# Altium PCB adl5960-devboard.PcbDoc (part 2 of 2)
Units mm, origin at the board's own origin, x right, y up, seen from the top; angles counter-clockwise.
Board outline 70 x 110 mm, 4 copper layers (Top Layer, Inner 1, Inner 2, Bottom Layer), stack 1.072 mm thick; 69 components, 54 nets, 253 pads, 0 vias.
Unrouted connection lines stored in the file: 176.
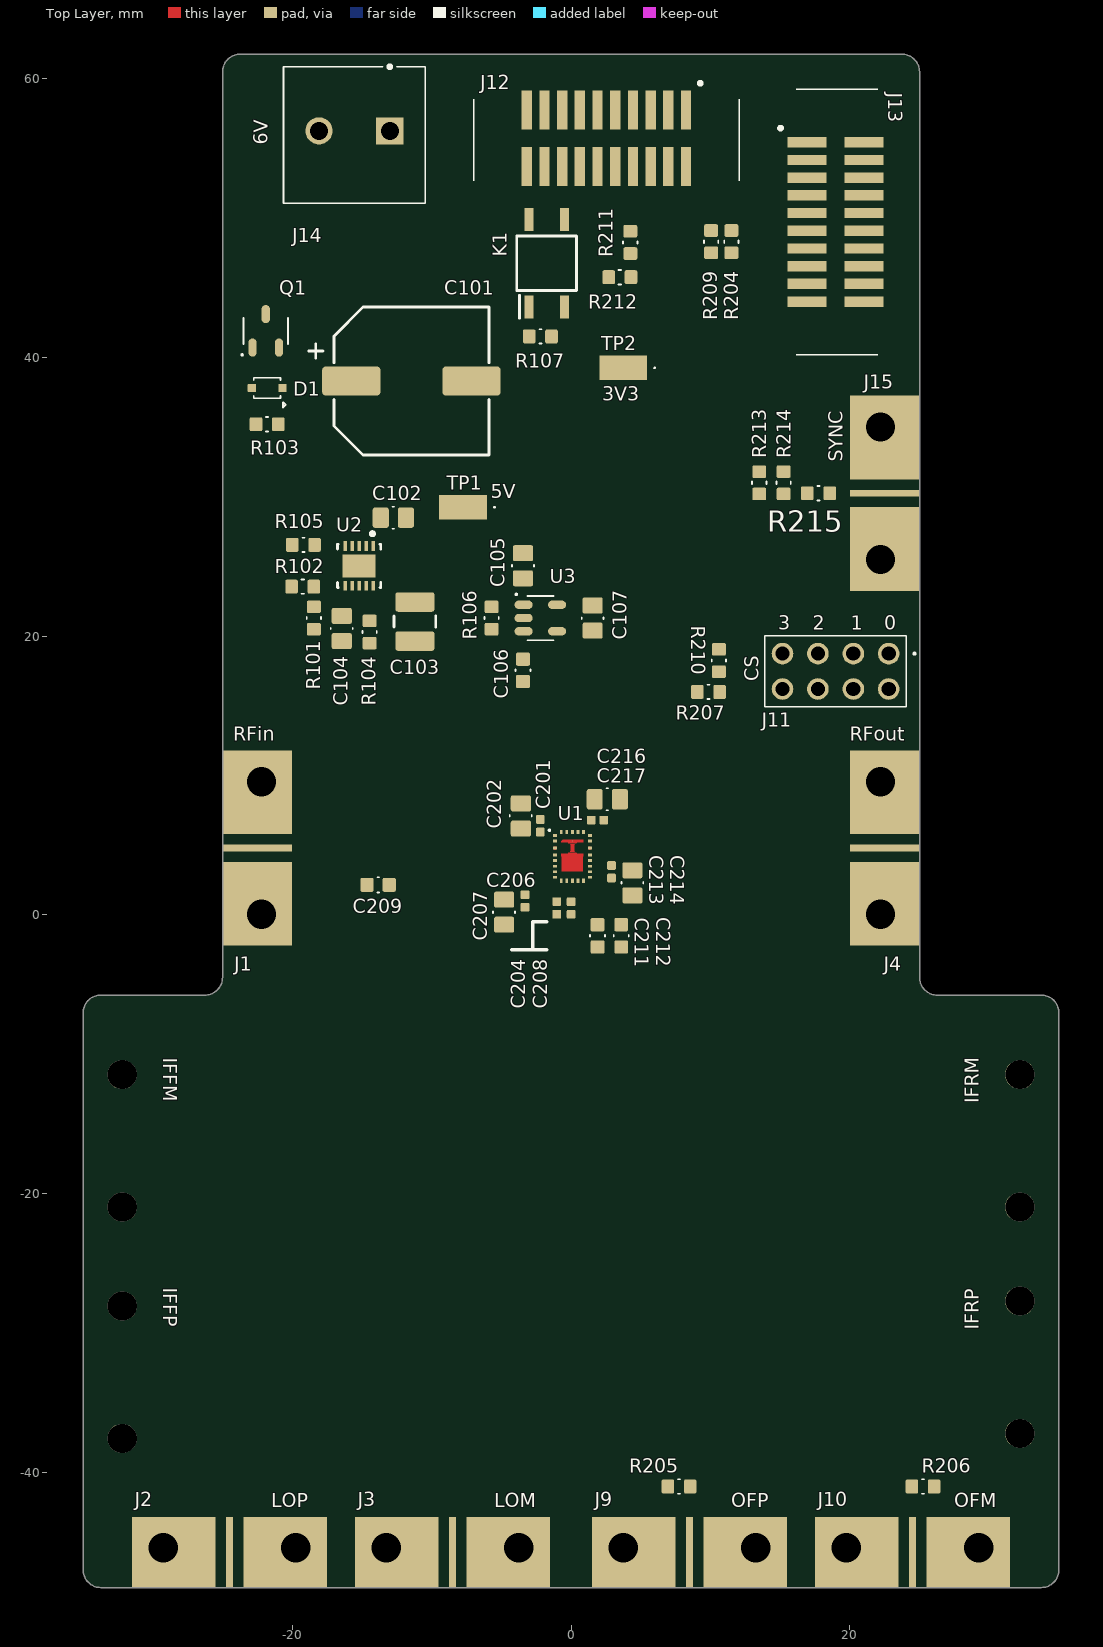
[diagram p0: Top Layer view]

## Other copper (continued)
Top Layer: (continued)
  region net GND: -0.044,4.554 -0.04,4.552 -0.036,4.55 -0.032,4.547 -0.028,4.546 -0.023,4.544 -0.018,4.543 -0.014,4.542 -0.009,4.541 -0.004,4.54 0.001,4.54 0.19,4.54 0.195,4.54 0.2,4.541 0.204,4.542 0.209,4.543 0.214,4.544 0.218,4.546 0.222,4.547 0.227,4.549 0.231,4.552 0.235,4.554 0.239,4.557 0.243,4.56 0.246,4.563 0.249,4.567 0.253,4.57 0.256,4.574 0.219,4.609 0.219,4.991 0.256,5.026 0.253,5.029 0.249,5.033 0.246,5.037 0.243,5.04 0.239,5.043 0.235,5.045 0.231,5.048 0.227,5.05 0.222,5.052 0.218,5.054 0.214,5.056 0.209,5.057 0.204,5.058 0.2,5.059 0.195,5.059 0.19,5.059 0.001,5.059 -0.004,5.059 -0.009,5.059 -0.014,5.058 -0.018,5.057 -0.023,5.055 -0.027,5.054 -0.032,5.052 -0.036,5.05 -0.04,5.048 -0.044,5.045 -0.048,5.043 -0.052,5.04 -0.055,5.036 -0.059,5.033 -0.062,5.029 -0.065,5.026 -0.029,4.991 -0.029,4.609 -0.065,4.574 -0.062,4.57 -0.059,4.567 -0.056,4.563 -0.052,4.56 -0.048,4.557

## Silkscreen, mask and mechanical layers (free items; w line width, h text height)
Top Overlay:
  lines w0.254: -4.25,-2.5 -1.75,-2.5 ; -2.75,-2.5 -2.75,-0.5 -1.75,-0.5
  text "6V" at -21.754,55.254 h1 r90
  text "3V3" at 2.254,36.904 h1
  text "SYNC" at 19.496,32.504 h1 r90
  text "5V" at -5.746,29.904 h1
  text "3" at 14.854,20.454 h1
  text "2" at 17.354,20.454 h1
  text "1" at 20.054,20.454 h1
  text "0" at 22.454,20.454 h1
  text "CS" at 13.462,16.764 h1 r90
  text "RFin" at -24.246,12.504 h1
  text "RFout" at 20.004,12.504 h1
  text "IFFM" at -29.246,-10.254 h1 r270
  text "IFRM" at 29.246,-13.496 h1 r90
  text "IFFP" at -29.246,-26.754 h1 r270
  text "IFRP" at 29.246,-29.746 h1 r90
  text "LOP" at -21.496,-42.496 h1
  text "LOM" at -5.496,-42.496 h1
  text "OFP" at 11.504,-42.496 h1
  text "OFM" at 27.504,-42.496 h1
Bottom Overlay:
  text "SYNC" at 19.496,36.246 h1 r90
  text "RFin" at -20.504,12.504 h1
  text "RFout" at 24.246,12.504 h1
  text "IFRM" at 29.246,-10.004 h1 r90
  text "IFFM" at -29.246,-13.746 h1 r270
  text "IFRP" at 29.246,-26.254 h1 r90
  text "IFFP" at -29.246,-30.246 h1 r270
  text "LOP" at -18.754,-42.246 h1
  text "LOM" at -2.754,-42.246 h1
  text "OFP" at 13.996,-42.246 h1
  text "OFM" at 30.246,-42.246 h1
Mechanical 1:
  drawing of 535 lines, arcs and shapes, not listed
  text "Layer" at -51.531,173.706 h1.52
  text "Name" at -41.12,173.706 h1.52
  text "Material" at -7.347,173.706 h1.52
  text "Thickness" at 14.491,173.706 h1.52
  text "Constant" at 30.996,173.706 h1.52
  text "Board Layer Stack" at 45.471,173.706 h1.52
  text "Top Overlay" at -41.12,170.658 h1.52
  text "Top Solder" at -41.12,167.61 h1.52
  text "Solder Resist" at -7.347,167.61 h1.52
  text "0.79mil" at 14.491,167.61 h1.52
  text "3.9" at 30.996,167.61 h1.52
  text "Top Surface Finish" at -41.12,164.562 h1.52
  text "Nickel, Gold" at -7.347,164.562 h1.52
  text "0.16mil" at 14.491,164.562 h1.52
  text "1" at -51.531,161.514 h1.52
  text "Top Layer" at -41.12,161.514 h1.52
  text "1.18mil" at 14.491,161.514 h1.52
  text "Dielectric 1" at -41.12,158.466 h1.52
  text "RO4350B" at -7.347,158.466 h1.52
  text "10.00mil" at 14.491,158.466 h1.52
  text "3.66" at 30.996,158.466 h1.52
  text "2" at -51.531,155.418 h1.52
  text "Inner 1" at -41.12,155.418 h1.52
  text "CF-004" at -7.347,155.418 h1.52
  text "0.47mil" at 14.491,155.418 h1.52
  text "Dielectric 2" at -41.12,152.37 h1.52
  text "PR7628" at -7.347,152.37 h1.52
  text "7.09mil" at 14.491,152.37 h1.52
  text "4.8" at 30.996,152.37 h1.52
  text "Dielectric 3" at -41.12,149.322 h1.52
  text "PR2116" at -7.347,149.322 h1.52
  text "4.72mil" at 14.491,149.322 h1.52
  text "4.8" at 30.996,149.322 h1.52
  text "Dielectric 4" at -41.12,146.274 h1.52
  text "PR7628" at -7.347,146.274 h1.52
  text "7.09mil" at 14.491,146.274 h1.52
  text "4.8" at 30.996,146.274 h1.52
  text "3" at -51.531,143.226 h1.52
  text "Inner 2" at -41.12,143.226 h1.52
  text "CF-004" at -7.347,143.226 h1.52
  text "0.47mil" at 14.491,143.226 h1.52
  text "Dielectric 5" at -41.12,140.178 h1.52
  text "RO4350B" at -7.347,140.178 h1.52
  text "10.00mil" at 14.491,140.178 h1.52
  text "3.66" at 30.996,140.178 h1.52
  text "4" at -51.531,137.13 h1.52
  text "Bottom Layer" at -41.12,137.13 h1.52
  text "1.18mil" at 14.491,137.13 h1.52
  text "Bottom Surface Finish" at -41.12,134.082 h1.52
  text "Nickel, Gold" at -7.347,134.082 h1.52
  text "0.16mil" at 14.491,134.082 h1.52
  text "Bottom Solder" at -41.12,131.034 h1.52
  text "Solder Resist" at -7.347,131.034 h1.52
  text "0.79mil" at 14.491,131.034 h1.52
  text "3.9" at 30.996,131.034 h1.52
  text "Bottom Overlay" at -41.12,127.986 h1.52
  text "Total board thickness:" at -51.531,124.938 h1.52
  text "44.09mil" at 14.491,124.938 h1.52
Board Outline:
  lines w0.254: -35,-46.98 ccw(c-33.73,-46.98) -33.73,-48.25 33.73,-48.25 ccw(c33.73,-46.98) 35,-46.98 35,-7.02 ccw(c33.73,-7.02) 33.73,-5.75 26.27,-5.75 cw(c26.27,-4.48) 25,-4.48 25,60.48 ccw(c23.73,60.48) 23.73,61.75 -23.73,61.75 ccw(c-23.73,60.48) -25,60.48 -25,32 -25,-4.48 cw(c-26.27,-4.48) -26.27,-5.75 -33.73,-5.75 ccw(c-33.73,-7.02) -35,-7.02 -35,-46.98

## Dimensions
-35,-46.98 to 35,-46.98 on Top Assembly
-23.73,61.75 to -33.73,-48.25 on Top Assembly